# Altium PCB DB42.PcbDoc (part 4 of 8)
Units mil, origin at the board's own origin, x right, y up, seen from the top; angles counter-clockwise.
Board outline 3236.22 x 4456.69 mil, 8 copper layers (Top Layer, MidLayer1, MidLayer2, GND-Layer5, MidLayer3, VCC, MidLayer4, Bottom Layer), stack 62.194 mil thick; 214 components, 470 nets, 1802 pads, 1663 vias.
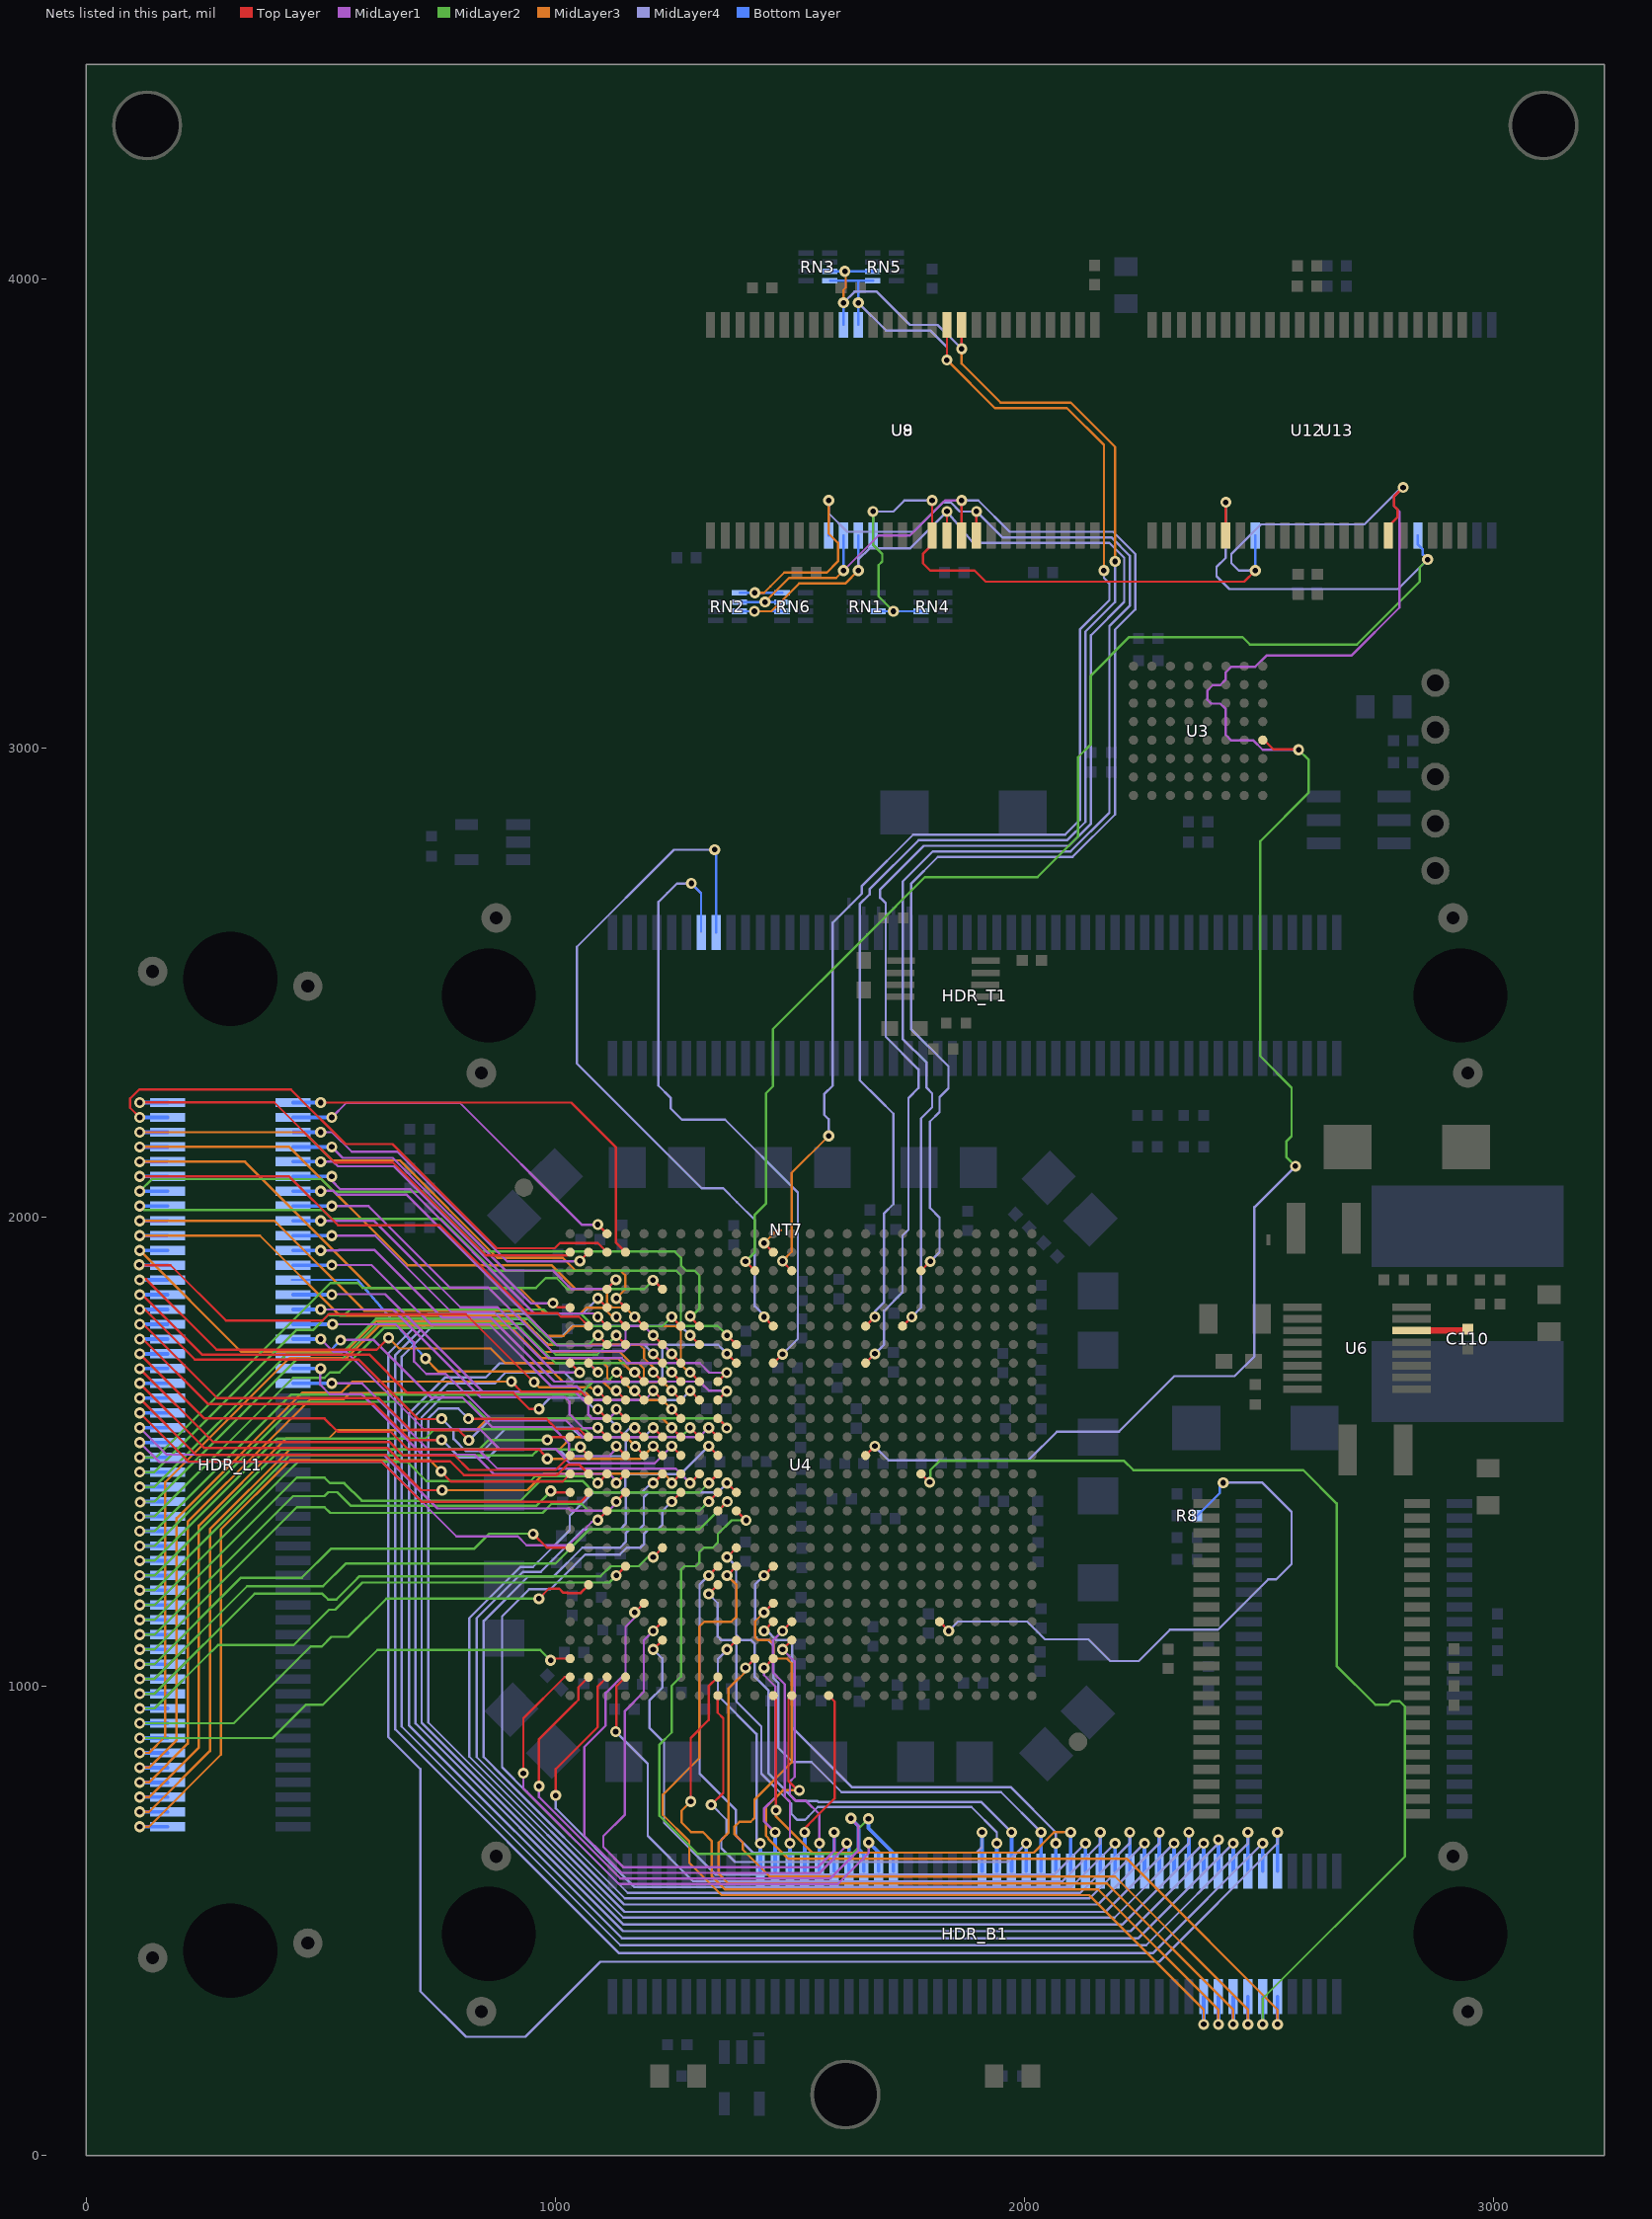
[diagram p10: the nets of this part, all layers, seen from the top]

## Via types
v1: diameter 23.62, hole 11.81, Top Layer to Bottom Layer, 1081 vias
v2: diameter 23.62, hole 11.81, Top Layer to Bottom Layer, tented both sides, 466 vias
v3: diameter 27.56, hole 15.75, Top Layer to Bottom Layer, 116 vias

## Nets (pads, with @x,y where several pads share a name; then routed paths per layer and width w, separated by ;. In a path a pad name is that pad's centre, name@x,y a point inside that pad or via, vN(x,y) a via of type N, cw(c..) or ccw(c..) an arc to the next point about the centre after c; other vN are vias at no path point) (continued)
BUS_NWE: RN1.7 RN4.6 U3.A5 U4.N17 U8.16 U9.16 U12.17 U13.17 | length 5598.1
  Top Layer w5: U4.N17@1661.42,1492.13 v1(1681.1,1511.81) ; U8.16@1803.14,3452.75 v2(1803.14,3527.55) ; U8.16@1803.15,3460.62 1803.15,3433.07 1783.46,3413.39 1783.46,3393.7 1799.21,3377.95 1893.7,3377.95 1917.32,3354.33 2468.5,3354.33 v1(2492.13,3377.95) ; U3.A5@2507.87,3016.73 2510.82,3016.74 2530.31,2997.24 v1@2583.46,2997.24 ; v1@2582.28,2998.03 v1(2584.25,2996.06) ; U12.17@2775.59,3452.76 2775.59,3472.44 2795.28,3492.13 2795.28,3507.87 2787.4,3515.75 2787.4,3535.43 v1(2807.09,3555.12)
  MidLayer1 w5: v1(2584.25,2996.06) 2507.87,2996.06 2488.19,3015.75 2440.94,3015.75 2429.13,3027.56 2429.13,3082.68 2417.32,3094.49 2397.64,3094.49 2389.76,3102.36 2389.76,3122.05 2401.57,3133.86 2417.32,3133.86 2429.13,3145.67 2429.13,3161.42 2440.94,3173.23 2492.13,3173.23 2515.75,3196.85 2696.85,3196.85 2799.21,3299.21 2799.21,3503.94 2787.4,3515.75 2787.4,3535.43 v1(2807.09,3555.12)
  MidLayer2 w5: v2(1677.17,3503.94) 1677.17,3433.07 1696.85,3413.39 1696.85,3397.64 1688.98,3389.76 1688.98,3322.83 v1(1720.47,3291.34) ; v1(2577.56,2108.66) 2557.87,2128.35 2557.87,2161.02 2569.29,2172.44 2569.29,2275.99 2502.31,2342.96 2502.31,2801.13 2605.91,2904.72 2605.91,2974.41 v1(2584.25,2996.06)
  MidLayer4 w5: v2(1677.17,3503.94) 1720.47,3503.94 1744.09,3527.55 v2(1803.14,3527.55) ; v1@1681.1,1510.69 1709.9,1481.89 2008.27,1481.89 2069.29,1542.91 2201.18,1542.91 2319.37,1661.1 2447.92,1661.1 2490.08,1703.26 2490.08,2021.18 v1(2577.56,2108.66) ; v1(2492.13,3377.95) 2456.69,3377.95 2440.94,3393.7 2440.94,3413.39 2503.94,3476.38 2724.41,3476.38 v1@2805.12,3557.09
  Bottom Layer w5: U9.16@1677.17,3452.76 v2(1677.17,3503.94) ; RN1.7@1688.18,3291.34 RN4.6@1779.53,3291.33 RN4.6@1779.92,3291.34 ; v1(2492.13,3377.95) U13.17@2492.13,3452.76
BUS_SDRAM_CKE: RN3.7 RN5.6 U4.F17 U8.37 U9.37 | length 3341.3
  Top Layer w5: U4.F17@1661.42,1767.72 v1(1681.1,1787.4) ; v2(1866.14,3850.39) U8.37@1866.14,3901.57
  MidLayer3 w5: v2(1614.17,3948.82) 1614.17,3976.38 1618.9,3981.11 v1@1618.9,4015.75 ; v2(1866.14,3850.39) 1866.14,3818.9 1948.82,3736.22 2098.43,3736.22 2192.91,3641.73 v1(2192.91,3397.64)
  MidLayer4 w5: v2(1614.17,3948.82) 1637.8,3972.44 1685.04,3972.44 1755.91,3901.57 1814.96,3901.57 v2(1866.14,3850.39) ; v1(1681.1,1787.4) 1681.1,1799.31 1700.79,1819 1700.79,1925.59 1700.89,1925.69 1700.89,2008.37 1720.47,2027.95 1720.47,2220.47 1689.76,2251.18 1648.82,2292.12 1648.82,2666.9 1669.68,2687.76 1669.68,2698.43 1774.41,2803.15 2090.55,2803.15 2129.92,2842.52 2129.92,3248.03 2192.91,3311.02 v1(2192.91,3397.64)
  Bottom Layer w5: RN3.7@1586.22,4015.75 v1(1617.14,4015.75) RN5.6@1676.19,4015.75 RN5.6@1677.56,4015.75 ; U9.37@1614.17,3901.57 v2(1614.17,3948.82)
BUS_SDRAM_CLK: NT7.2 RN3.8 RN5.5 U4.C13 U8.38 U9.38 | length 3185.7
  Top Layer w5: v1@1484.25,1905.51 U4.C13@1503.94,1885.83 ; v2(1834.64,3826.77) U8.38@1834.65,3901.57
  MidLayer1 w5: v1(1484.25,1906.3) v1@1485.43,1906.3
  MidLayer3 w5: v1(1484.25,1906.3) 1503.96,1926 1503.96,2094.47 v1(1582.68,2173.23) ; v2(1834.64,3826.77) 1937,3724.41 2090.55,3724.41 2169.29,3645.67 v1(2169.29,3377.95)
  MidLayer4 w5: v1(1582.68,2173.23) 1582.68,2208.66 1573,2218.34 1573,2262 1591.2,2280.2 1591.2,2627.42 1653.54,2689.76 1653.54,2705.91 1762.6,2814.96 2086.61,2814.96 2118.11,2846.46 2118.11,3251.97 2181.1,3314.96 2181.1,3350.39 2169.29,3362.2 v1(2169.29,3377.95) ; v2(1645.67,3948.82) 1704.72,3889.76 1799.21,3889.76 1834.64,3854.34 v2(1834.64,3826.77)
  Bottom Layer w5: RN3.8@1586.22,3996.06 RN5.5@1676.19,3996.06 RN5.5@1677.56,3996.06 ; U9.38@1645.67,3901.57 v2(1645.67,3948.82) 1645.67,3996.06
BUS_SDRAM_FEEDBACK: NT7.1 U4.B12 | length 75.8
  Top Layer w5: v1(1444.88,1944.88) U4.B12@1464.57,1925.2
  MidLayer2 w5: v1(1444.88,1944.88) v1@1445.67,1944.88
  MidLayer3 w5: v1(1444.88,1944.88) 1472.44,1972.44 NT7.1@1480.65,1972.44
BUS_SDRAM_NCAS: RN2.7 RN6.6 U4.H17 U8.17 U9.17 | length 3341.6
  Top Layer w5: U4.H17@1661.42,1688.98 v1(1681.1,1708.66) ; U8.17@1834.65,3452.76 1834.64,3499.99 v1(1834.65,3503.94)
  MidLayer3 w5: v1(1424.23,3291.34) 1460.63,3291.34 1519.68,3350.39 1618.11,3350.39 v2(1645.67,3377.95)
  MidLayer4 w5: v2(1645.67,3377.95) 1645.67,3401.57 1669.29,3425.2 1755.91,3425.2 v1(1834.65,3503.94) 1890.42,3437.01 2181.1,3437.01 2212.6,3405.51 2212.6,3311.02 2141.73,3240.16 2141.73,2838.58 2094.49,2791.34 1785.43,2791.34 1692.52,2698.43 1692.52,2680.71 1704.26,2668.96 1704.26,2384.54 1774.02,2314.78 1774.02,2275.2 1752.76,2253.94 1752.76,1973.23 1740.18,1960.65 1740.18,1905.78 ; v1@1682.28,1709.84 1700.79,1728.35 1700.79,1800.39 1740.16,1839.76 1740.16,1905.04
  Bottom Layer w5: RN2.7@1393.3,3291.34 RN6.6@1483.28,3291.34 ; v2(1645.67,3377.95) U9.17@1645.67,3452.76
BUS_SDRAM_NCS: RN2.5 RN6.8 U4.F19 U8.19 U9.19 | length 3385.9
  Top Layer w5: U4.F19@1740.16,1767.72 v1(1759.84,1787.4) ; U8.19@1897.64,3452.76 v2(1897.63,3503.93)
  MidLayer3 w5: v1(1425.2,3330.71) 1444.88,3330.71 1458.54,3344.36 1488.19,3374.02 1578.74,3374.02 1602.36,3397.64 1602.36,3437.01 1582.68,3456.69 v2(1582.68,3527.56)
  MidLayer4 w5: v2(1582.68,3527.56) 1582.68,3500 1622.05,3460.63 1763.78,3460.63 1826.77,3523.62 1842.52,3523.62 1862.21,3503.93 v2(1897.63,3503.93) 1952.76,3448.82 2185.04,3448.82 2224.41,3409.45 2224.41,3303.15 2181.1,3259.84 2181.1,2862.2 2098.43,2779.53 1804.72,2779.53 1740.3,2715.1 1740.3,2380.17 1791.34,2329.13 1791.34,2275.59 1803.15,2263.78 1803.15,2234 1779.53,2210.38 1779.53,1807.09 v1(1759.84,1787.4) v1@1759.45,1787.01
  Bottom Layer w5: RN2.5@1393.31,3330.71 v1(1425.2,3330.71) RN6.8@1483.28,3330.71 RN6.8@1484.26,3330.71 ; U9.19@1582.68,3452.76 v2(1582.68,3527.56)
BUS_SDRAM_NRAS: RN2.6 RN6.7 U4.C20 U8.18 U9.18 | length 3143.8
  Top Layer w5: U4.C20@1779.53,1885.83 v1(1799.21,1905.51) ; U8.18@1866.14,3452.76 v1(1866.14,3527.55)
  MidLayer1 w5: v2(1614.17,3377.95) 1688.98,3452.76 1755.91,3452.76 1830.7,3527.55 v1(1866.14,3527.55)
  MidLayer3 w5: v1(1446.86,3311.02) 1498.05,3362.2 1598.43,3362.2 v2(1614.17,3377.95)
  MidLayer4 w5: v1(1799.21,1905.51) 1818.9,1925.2 1818.9,1999.21 1798.43,2019.68 1798.43,2203.54 1818.9,2224.02 1818.9,2255.91 1837.88,2274.89 1837.88,2321.56 1758.27,2401.18 1758.27,2710.63 1815.35,2767.72 2102.36,2767.72 2192.91,2858.27 2192.91,3251.97 2236.22,3295.28 2236.22,3413.39 2188.98,3460.63 1968.5,3460.63 1901.58,3527.55 v1(1866.14,3527.55) v1@1858.27,3531.5
  Bottom Layer w5: RN2.6@1393.3,3311.02 v1(1446.86,3311.02) RN6.7@1483.28,3311.02 RN6.7@1484.64,3311.02 ; v2(1614.17,3377.95) U9.18@1614.17,3452.76
BUS_SRAM_NCS: U4.C11 U12.6 U13.6 | length 3357.1
  Top Layer w5: v1(1405.51,1905.51) U4.C11@1425.2,1885.83 ; U12.6@2429.13,3452.76 2429.13,3503.94 v2(2429.13,3523.62)
  MidLayer2 w5: v1(1405.51,1905.51) 1425.2,1925.2 1425.2,2005.12 1448.82,2028.74 1448.82,2244.09 1448.82,2263.78 1463.83,2278.79 1463.83,2400.84 1665.15,2602.16 ; 1664.95,2601.96 1665.15,2602.16 ; v2(2859.27,3401.57) 2842.52,3384.83 2842.52,3354.33 2708.66,3220.47 2480.32,3220.47 2464.57,3236.22 2223.42,3236.22 2141.73,3154.53 2141.73,3007.87 2114.17,2980.32 2114.17,2811.02 2027.56,2724.41 1787.4,2724.41 1665.15,2602.16
  MidLayer4 w5: v2(2429.13,3523.62) 2429.13,3405.51 2409.45,3385.83 2409.45,3366.14 2437.01,3338.58 2796.28,3338.58 v2(2859.27,3401.57)
  Bottom Layer w5: U13.6@2838.58,3452.76 2838.58,3433.42 2848.92,3423.08 2848.92,3411.92 v2(2859.27,3401.57)
BUZZER: HDR_B1.40 U4.T10 | length 1446.8
  Top Layer w5: U4.T10@1385.83,1374.02 1386.61,1374.02 v1(1406.69,1353.94)
  MidLayer2 w5: v1(1406.69,1353.94) 1375.59,1353.94 1346.46,1324.8 1346.46,1306.3 1335.43,1295.27 1316.14,1295.27 1307.09,1286.22 1307.09,1263.39 1299.77,1256.07 1274.58,1256.07 1268.09,1249.59 1268.09,1021.09 1248,1001 1248,902 1222,876 1222,724 1303.09,642.91 1632.68,642.91 1645.28,655.51 1645.28,695.67 v2(1667.32,717.72)
  Bottom Layer w7.87: v2(1667.32,717.72) 1667.32,697.64 1720.47,644.49 HDR_B1.40@1720.47,606.3
CAN_RXD: HDR_T1.14 U4.H12 | length 1378.5
  Top Layer w5: U4.H12@1464.57,1688.98 1465.35,1688.98 v1(1484.25,1707.87)
  MidLayer4 w5: v1@1288.98,2711.02 1259.06,2711.02 1238.95,2690.92 1219.68,2671.65 1219.68,2280.31 1245.67,2254.32 1245.67,2231.89 1269.69,2207.87 1361.81,2207.87 1516.93,2052.76 1516.93,1740.55 v1(1484.25,1707.87)
  Bottom Layer w5: v1(1289.76,2711.42) 1310.63,2690.55 HDR_T1.14@1310.63,2609.06
CAN_TXD: HDR_T1.16 U4.F12 | length 1562.1
  Top Layer w5: v1(1444.88,1787.4) U4.F12@1464.57,1767.72
  MidLayer4 w5: v1(1339.76,2783.07) 1253.15,2783.07 1046.06,2575.98 1046.06,2327.17 1311.71,2061.52 1357.77,2061.52 1387.13,2032.16 1425.2,1994.09 1425.2,1810.24 1444.88,1790.55 v1(1444.88,1787.4)
  Bottom Layer w5: HDR_T1.16@1342.52,2606.3 v1@1342.52,2780.32
COMP: C110.2 U6.6 | length 121.4
  Top Layer w13.78: U6.6@2824.58,1758.25 2942.3,1758.25 C110.2@2944.88,1760.82
DAU_RESET_SW: HDR_B1.38 U4.AE1 | length 1225.8
  Top Layer w5: v1(931.85,814.75) 931.85,931.72 1019.81,1019.68 U4.AE1@1031.5,1019.68
  MidLayer1 w5: v1(931.85,814.75) 931.85,782.28 1135.39,578.74 1602.36,578.74 1661.24,637.61 1668.11,644.49 v2(1668.11,667.32)
  Bottom Layer w7.87: v2(1668.11,667.32) 1688.98,646.46 HDR_B1.38@1688.98,606.3
DAU_TFT_BLIGHT: HDR_B1.91 U4.AF13 | length 1698.6
  Top Layer w5: U4.AF13@1503.94,980.31 1496.85,973.23 1496.85,798.43 1516.93,778.35 v1(1520.08,778.35)
  MidLayer3 w5: v1(1520.08,778.35) 1485.22,778.35 1449,742.13 1449,681.27 1453.73,676.54 1453.73,675.01 1496.06,632.68 2218.11,632.68 2251.57,599.21 ; 2251.38,599.02 2539.37,311.02 v2(2539.37,279.53)
  Bottom Layer w7.87: v2(2539.37,279.53) HDR_B1.91@2539.37,338.58
DAU_TFT_BLUE0: HDR_B1.62 U4.AB12 | length 1014.6
  Top Layer w5: v1(1444.88,1118.11) U4.AB12@1464.57,1137.8
  MidLayer4 w5: v1(1444.88,1118.11) 1451.58,1118.11 1471.26,1098.43 1496.85,1098.43 1504.54,1090.74 1504.54,912.79 1539.37,877.95 ; 1539.37,877.95 1542.25,875.06 1632.68,784.65 1971.26,784.65 2066.93,688.98 v2(2066.93,665.35)
  Bottom Layer w7.87: HDR_B1.62@2066.93,606.3 v2(2066.93,665.35)
DAU_TFT_BLUE1: HDR_B1.64 U4.AF12 | length 1020.7
  Top Layer w5: U4.AF12@1464.57,980.31 1470.47,974.41 v1(1470.47,735.83)
  MidLayer3 w5: v1(1470.47,735.83) 1470.47,722.44 1506.16,686.75 1547.24,645.67 2019.69,645.67 2055.88,681.86 2062.99,688.98 v2(2098.42,688.98)
  Bottom Layer w7.87: v2(2098.42,688.98) HDR_B1.64@2098.43,606.3
DAU_TFT_BLUE2: HDR_B1.66 U4.AC6 | length 1460.6
  Top Layer w5: v1(1208.66,1078.74) U4.AC6@1228.35,1098.42
  MidLayer4 w5: v1(1208.66,1078.74) 1227.97,1059.43 1227.97,997.26 1200.39,969.68 1200.39,911.61 1231.66,880.34 1231.66,709.29 1342.52,598.43 2062.99,598.43 v2(2129.92,665.35)
  Bottom Layer w7.87: HDR_B1.66@2129.92,606.3 v2(2129.92,665.35)
DAU_TFT_BLUE3: HDR_B1.68 U4.AE4 | length 1520.6
  Top Layer w5: v1(1128.65,903.31) 1130.19,904.86 1130.19,965.58 1130.16,1000.24 ; 1129.92,1000 1130.16,1000.24 ; 1130.16,1000.71 1130.16,1000.24 ; U4.AE4@1149.61,1019.68 1130.16,1000.24
  MidLayer4 w5: v1(1128.65,903.31) 1196.96,835 1196.96,714.47 1196.91,681.04 1293.31,584.65 2080.71,584.65 2161.42,665.35 v2(2161.42,688.98)
  Bottom Layer w7.87: HDR_B1.68@2161.42,606.3 v2(2161.42,688.98)
DAU_TFT_BLUE4: HDR_B1.70 U4.AE3 | length 1683.9
  Top Layer w5: v1(1000.73,767.52) 1000.73,823.61 1090.55,913.43 1090.55,1000 U4.AE3@1110.24,1019.68
  MidLayer4 w5: v1(1000.73,767.52) 1000.73,739.97 1167.86,572.83 2100.39,572.83 v2(2192.91,665.35)
  Bottom Layer w7.87: HDR_B1.70@2192.91,606.3 v2(2192.91,665.35)
DAU_TFT_CL1: HDR_B1.88 U4.H6 | length 3600.2
  Top Layer w5: v1(1208.66,1708.66) U4.H6@1228.35,1688.98
  MidLayer4 w5: 975.45,1736.68 939.84,1772.28 742.36,1772.28 672.44,1702.36 672.44,914.56 1138.57,448.43 2259.45,448.43 2476.38,665.35 v2(2476.38,688.98) ; 975.68,1736.91 984.25,1728.35 1188.98,1728.35 v1(1208.66,1708.66)
  Bottom Layer w7.87: HDR_B1.88@2476.38,606.3 v2(2476.38,688.98)
DAU_TFT_CL2: HDR_B1.90 U4.G8 | length 3780
  Top Layer w5: v1(1287.4,1748.03) U4.G8@1307.09,1728.35
  MidLayer4 w5: v1(1287.4,1748.03) 1267.72,1767.71 1035.41,1767.71 1013.26,1745.56 980.71,1745.56 943.99,1782.28 735.04,1782.28 659.06,1706.3 659.06,908.07 1136.02,431.1 2273.62,431.1 v2(2507.87,665.35)
  Bottom Layer w7.87: v2(2507.87,665.35) HDR_B1.90@2507.88,606.3 v2(2507.87,665.35)
DAU_TFT_CL3: HDR_B1.92 U4.E3 | length 4055.1
  Top Layer w5: v1(1090.55,1826.77) U4.E3@1110.24,1807.09
  MidLayer4 w5: 754.71,1793.7 728.35,1793.7 643.7,1709.06 643.7,892.3 712.2,823.8 712.2,350.39 809.65,252.95 936.02,252.95 1096.06,412.99 2287.01,412.99 2539.37,665.35 v2(2539.37,688.98) ; 754.72,1793.69 1057.47,1793.69 v1(1090.55,1826.77)
  Bottom Layer w7.87: HDR_B1.92@2539.37,606.3 v2(2539.37,688.98)
DAU_TFT_DISP_ON: HDR_B1.89 U4.P20 | length 2363.5
  Top Layer w5: U4.P20@1779.53,1452.76 v1@1799.21,1433.07
  MidLayer2 w5: v1@1799.21,1433.07 1799.21,1460.63 1818.9,1480.32 2212.6,1480.32 2232.28,1460.63 2594.49,1460.63 2665.35,1389.76 2665.35,1043.31 2748.03,960.63 2775.59,960.63 2783.46,968.5 2799.21,968.5 2811.02,956.69 2811.02,637.8 2507.88,334.65 v2(2507.88,279.53)
  Bottom Layer w7.87: v2(2507.88,279.53) HDR_B1.89@2507.88,338.58
  other v1: 1798,1435
DAU_TFT_GREEN0: HDR_B1.72 U4.R7 | length 2441
  Top Layer w5: v1(1248.03,1393.7) U4.R7@1267.72,1413.39
  MidLayer4 w5: v1(1248.03,1393.7) 1227.97,1373.64 1227.97,1344.51 1217.73,1334.27 1198.03,1334.27 1189.35,1325.59 1189.35,1303.52 1181.48,1295.65 1152.31,1295.65 1137.37,1280.71 1063.39,1280.71 989.37,1206.69 943.96,1206.69 886.58,1149.31 886.58,827.54 939.49,774.63 1154.29,559.84 2118.9,559.84 2224.41,665.36 v2(2224.41,688.98)
  Bottom Layer w7.87: HDR_B1.72@2224.41,606.3 v2(2224.41,688.98)
DAU_TFT_GREEN1: HDR_B1.74 U4.R10 | length 2644.9
  Top Layer w5: v1(1366.14,1433.07) U4.R10@1385.83,1413.39
  MidLayer4 w5: v1(1366.14,1433.07) 1346.46,1413.38 1198.82,1413.38 1188.6,1403.16 1188.6,1344.49 1179.13,1335.02 1158.25,1335.02 1152.62,1329.4 1149.98,1326.75 1149.98,1307.46 1137.8,1295.28 1057.48,1295.28 996.06,1233.86 941.7,1233.86 847.31,1139.47 847.31,849.11 890.61,805.8 1147.99,548.43 2138.97,548.43 v2(2255.9,665.35)
  Bottom Layer w7.87: HDR_B1.74@2255.91,606.3 v2(2255.9,665.35)
DAU_TFT_GREEN2: HDR_B1.76 U4.P6 | length 2597.7
  Top Layer w5: v1(1208.66,1433.07) U4.P6@1228.35,1452.76
  MidLayer4 w5: v1(1208.66,1433.07) 1208.27,1432.68 1203.97,1432.68 1184.68,1413.38 1160.63,1413.38 1153.45,1406.2 1149.98,1402.74 1149.98,1346.46 1137.79,1334.27 1059.47,1334.27 969.29,1244.1 931.18,1244.1 832.46,1145.38 832.46,849.24 1146.66,535.04 2157.09,535.04 2287.4,665.35 v2(2287.4,688.98)
  Bottom Layer w7.87: HDR_B1.76@2287.4,606.3 v2(2287.4,688.98)
DAU_TFT_GREEN3: HDR_B1.78 U4.N9 | length 2773
  Top Layer w5: v1(1326.77,1511.81) U4.N9@1346.46,1492.13
  MidLayer4 w5: v1(1326.77,1511.81) 1267.47,1452.51 1158.02,1452.51 1149.23,1443.72 1149.23,1424.84 1137.4,1413.01 1079.9,1413.01 1030.71,1363.82 1030.71,1332.68 962.76,1264.73 952.36,1254.33 925.68,1254.33 816.72,1145.38 816.72,850.18 1147.6,519.29 2172.83,519.29 v2(2318.9,665.35)
  Bottom Layer w7.87: HDR_B1.78@2318.9,606.3 v2(2318.9,665.35)
DAU_TFT_GREEN4: HDR_B1.80 U4.M2 | length 2993.6
  Top Layer w5: v1(814.75,1570.46) 980.67,1570.46 991.85,1559.29 ; 988.41,1562.73 1002.24,1548.9 1050.08,1548.9 1067.48,1531.5 U4.M2@1070.87,1531.5
  MidLayer4 w5: 729,1083.38 729,1570.32 750.79,1592.11 793.1,1592.11 v1(814.75,1570.46) ; 729.14,1083.38 729.14,922.99 1145.05,507.09 2192.13,507.09 2350.39,665.35 v2(2350.39,688.98)
  Bottom Layer w7.87: HDR_B1.80@2350.4,606.3 v2(2350.39,688.98)
DAU_TFT_GREEN5: HDR_B1.82 U4.K8 | length 3265.7
  Top Layer w5: v1(1287.4,1629.92) U4.K8@1307.09,1610.24
  MidLayer4 w5: v1(1287.4,1629.92) 1267.71,1610.23 1078.46,1610.23 1060.22,1628.48 770.06,1628.48 715,1573.42 715,922.42 1145.3,492.13 2208.66,492.13 v2(2381.89,665.35)
  Bottom Layer w7.87: HDR_B1.82@2381.89,606.3 v2(2381.89,665.35)
DAU_TFT_IRQ: HDR_B1.81 U4.W10 | length 2087.6
  Top Layer w5: v1(1366.14,1236.22) U4.W10@1385.83,1255.91
  MidLayer3 w5: v1(1366.14,1236.22) 1386.2,1216.16 1386.2,1148.4 1375.22,1137.42 1316.95,1137.42 1307.09,1127.56 1307.09,847.09 1229,769 1229,726.12 1285.43,669.69 1285.43,624.02 1354.33,555.12 2137.8,555.12 2381.89,311.02 v2(2381.89,279.53)
  Bottom Layer w7.87: v2(2381.89,279.53) HDR_B1.81@2381.89,338.58
DAU_TFT_M: HDR_B1.87 U4.AA12 | length 1981.1
  Top Layer w5: v1(1444.88,1157.48) U4.AA12@1464.57,1177.17
  MidLayer3 w5: v1(1444.88,1157.48) 1428.1,1140.7 1425.57,1138.17 1425.57,1104.35 1431.5,1098.43 1456.3,1098.43 1464.57,1090.16 1464.57,1068.11 1473.62,1059.06 1494.09,1059.06 1503.84,1049.31 1503.84,837.84 1424.41,758.41 1424.41,719.29 1416.54,711.42 1392.52,711.42 1381.5,700.39 1381.5,685.43 1399.61,667.32 1399.61,651.97 1457.09,594.49 2192.91,594.49 2476.38,311.02 v2(2476.38,279.53)
  Bottom Layer w7.87: v2(2476.38,279.53) HDR_B1.87@2476.38,338.58
DAU_TFT_MUX: HDR_B1.85 U4.AD11 | length 1797.5
  Top Layer w5: v1(1405.51,1039.37) U4.AD11@1425.2,1059.05
  MidLayer3 w5: 1393,1019 1368.83,994.83 1368.83,687.73 1348.43,667.32 1348.43,600.39 1368.9,579.92 2175.98,579.92 2444.88,311.02 v2(2444.88,279.53) ; 1393.2,1018.8 1405.51,1031.1 v1(1405.51,1039.37)
  Bottom Layer w7.87: v2(2444.88,279.53) HDR_B1.85@2444.88,338.58
DAU_TFT_POL: HDR_B1.83 U4.AE9 | length 1786.2
  Top Layer w5: v1@1288,754 v1@1288,754.33 ; v1(1288.58,754.33) 1288.58,890.06 1326.77,928.25 1326.77,1000 U4.AE9@1346.46,1019.68
  MidLayer3 w5: v1(1288.58,754.33) 1269.06,734.8 1269.06,709.68 1289.2,689.54 1314.39,689.54 1332.97,670.97 1332.97,596.16 1362.2,566.93 2157.48,566.93 2413.39,311.03 v2(2413.39,279.53)
  Bottom Layer w7.87: v2(2413.39,279.53) HDR_B1.83@2413.39,338.58
DAU_TFT_RED0: HDR_B1.52 U4.W9 | length 1280.8
  Top Layer w5: v1(1326.77,1236.22) U4.W9@1346.46,1255.91
  MidLayer4 w5: v1(1326.77,1236.22) 1307.46,1216.91 1307.46,814.09 1384.55,737 1384.55,682.38 1410.96,655.97 1421.26,645.67 1897.64,645.67 1909.45,657.48 v2(1909.45,688.98)
  Bottom Layer w7.87: HDR_B1.52@1909.45,606.3 v2(1909.45,688.98)
DAU_TFT_RED1: HDR_B1.54 U4.Y9 | length 1159.8
  Top Layer w5: v1(1326.77,1196.85) U4.Y9@1346.46,1216.54
  MidLayer4 w5: v1(1326.77,1196.85) 1346.08,1177.54 1346.08,1106.28 1353.94,1098.43 1376.77,1098.43 1385.83,1089.37 1385.83,967.72 1439,914.54 1439,814.15 1502.76,750.39 1502.76,728.74 1516.14,715.35 1532.28,715.35 1539.76,722.83 ; 1539.7,722.9 1559.71,742.91 1885.04,742.91 ; 1867.63,742.92 1887,742.92 1940.94,688.98 v2(1940.94,665.35)
  Bottom Layer w7.87: HDR_B1.54@1940.95,606.3 v2(1940.94,665.35)
DAU_TFT_RED2: HDR_B1.56 U4.V10 | length 1190
  Top Layer w5: v1(1366.14,1275.59) U4.V10@1385.83,1295.28
  MidLayer4 w5: v1(1366.14,1275.59) 1385.45,1256.28 1385.45,1110.22 1397.24,1098.43 1417.32,1098.43 1425.2,1090.55 1425.2,1020.08 1454.72,990.55 1454.72,814.17 1512.99,755.91 1558.66,755.91 1561.42,753.15 1908.27,753.15 v2(1972.44,688.98)
  Bottom Layer w7.87: HDR_B1.56@1972.44,606.3 v2(1972.44,688.98)
DAU_TFT_RED3: HDR_B1.58 U4.AF9 | length 1100.1
  Top Layer w5: v1@1330.71,745.67 v1(1332.44,747.4) 1357.94,772.9 1357.94,932.06 1346,944 1346,980.31 1346,980.68 U4.AF9@1346.04,980.73
  MidLayer4 w5: v1(1332.44,747.4) 1333.31,747.4 1364.96,715.75 1364.96,683.86 1353.94,672.83 1353.94,654.72 1383.07,625.59 1964.17,625.59 v2(2003.94,665.35)
  Bottom Layer w7.87: HDR_B1.58@2003.94,606.3 v2(2003.94,665.35)
DAU_TFT_RED4: HDR_B1.60 U4.W12 | length 1152.5
  Top Layer w5: v1(1444.88,1236.22) U4.W12@1464.57,1255.91
  MidLayer4 w5: v1(1444.88,1236.22) 1425.57,1216.91 1425.57,1106.3 1433.44,1098.43 1453.15,1098.43 1464.57,1087.01 1464.57,1018.11 1475.2,1007.48 1475.2,869.29 1505.91,838.58 1546.06,838.58 1610.14,774.51 1949.9,774.51 v2(2035.43,688.98)
  Bottom Layer w7.87: HDR_B1.60@2035.43,606.3 v2(2035.43,688.98)
DAU_TFT_STH: HDR_B1.86 U4.H2 | length 3235
  Top Layer w5: U4.H2@1071.39,1688.98 v1(1090.99,1669.38)
  MidLayer4 w5: v1(1090.99,1669.38) 1071.77,1688.59 881.66,1688.59 851.26,1658.19 764.71,1658.19 688,1581.47 688,917 1141.61,463.39 2242.91,463.39 v2(2444.88,665.35)
  Bottom Layer w7.87: HDR_B1.86@2444.88,606.3 v2(2444.88,665.35)
DAU_TFT_STV: HDR_B1.84 U4.H10 | length 3510.4
  Top Layer w5: v1(1366.14,1708.66) U4.H10@1385.83,1688.98
  MidLayer4 w5: 1347.03,1727.97 1236.96,1727.97 1228.03,1719.05 1228.03,1657.06 1220.26,1649.28 1038.58,1649.28 1018.57,1669.29 894.46,1669.29 870.83,1645.67 770.89,1645.67 702,1576.78 702,921 1144.65,478.35 2226.38,478.35 v1@2413.38,665.35 ; 1347.1,1727.9 1355.95,1719.05 ; 1355.85,1718.95 v1(1366.14,1708.66)
  Bottom Layer w7.87: HDR_B1.84@2413.39,606.3 v1(2413.39,673.23)
DIP0: HDR_B1.22 U4.AC10 | length 547.2
  Top Layer w5: v1(1366.14,1078.74) U4.AC10@1385.83,1098.42
  MidLayer4 w5: v1@1366.14,1077.95 1346.46,1058.27 1346.46,980.71 1428.77,898.4 1428.77,673.59 v2(1437.01,665.35) ; v2@1437.1,666.05 1437.4,665.75 v2@1438.58,664.57
  Bottom Layer w7.87: HDR_B1.22@1437.01,606.3 v2(1437.01,665.35)
DIP1: HDR_B1.24 U4.AD12 | length 491
  Top Layer w5: v1(1444.88,1039.37) U4.AD12@1464.57,1059.05
  MidLayer1 w5: v1(1444.88,1039.37) 1444.88,1024 1469,999.88 1469,764 1444.49,739.49 1444.49,712.99 v2(1468.5,688.98)
  Bottom Layer w7.87: HDR_B1.24@1468.5,606.3 v2(1468.5,688.98)
DIP2: HDR_B1.26 U4.AB13 | length 562.8
  Top Layer w5: v1(1484.25,1118.11) U4.AB13@1503.94,1137.8
  MidLayer1 w5: v1(1484.25,1118.11) 1464.19,1098.05 1464.19,1029.13 1489,1004.33 1489,764.94 1500,753.94 v2(1500,665.35)
  Bottom Layer w7.87: HDR_B1.26@1500,606.3 v2(1500,665.35)
DIP3: HDR_B1.28 U4.AF15 | length 405.8
  Top Layer w5: v2(1531.5,688.98) 1531.5,697.16 1549.06,714.72 1595.47,761.14 1595.47,768.55 1595.47,967.52 U4.AF15@1582.68,980.31
  Bottom Layer w7.87: HDR_B1.28@1531.5,606.3 v2(1531.5,688.98)
DIP4: HDR_B1.30 U4.AC13 | length 554
  Top Layer w5: v1(1484.25,1078.74) U4.AC13@1503.94,1098.42
  MidLayer1 w5: v1(1484.25,1078.74) 1510,1052.99 1510,807 1500,797 1500,768.11 1511.81,756.3 1533.7,756.3 1562.99,727.01 v2(1562.99,665.35)
  Bottom Layer w7.87: HDR_B1.30@1562.99,606.3 v2(1562.99,665.35)
DIP5: HDR_B1.32 U4.AB6 | length 1179.2
  Top Layer w5: v1(1208.66,1118.11) U4.AB6@1228.35,1137.8
  MidLayer1 w5: v1(1208.66,1118.11) 1188.6,1098.05 1188.6,988 1148.32,947.72 1148.32,726.88 1102.36,680.93 1102.36,657.59 1145.78,614.17 1559.06,614.17 1594.49,649.61 v2(1594.49,688.98)
  Bottom Layer w7.87: HDR_B1.32@1594.49,606.3 v2(1594.49,688.98)
DIP6: HDR_B1.34 U4.AA5 | length 1231.5
  Top Layer w5: v1(1169.29,1157.48) U4.AA5@1188.98,1177.17
  MidLayer1 w5: 1102.08,641.57 1061.74,681.91 1061.74,870.84 1107.45,916.55 1107.45,985.8 1149.61,1027.95 1149.61,1127.15 1169.29,1146.83 v1(1169.29,1157.48) ; 1102.26,641.74 1141.64,602.36 1562.99,602.36 1623.82,663.19 v2@1625.98,665.35
  Bottom Layer w7.87: v2@1620.87,664.57 1625.98,659.45 HDR_B1.34@1625.99,606.3
  other v2: 1621.26,665.75
DIP7: HDR_B1.36 U4.AE2 | length 1275.3
  Top Layer w5: v1(965.3,787.2) 965.3,887.57 1040.09,962.35 ; 1040.26,962.18 1049.29,971.21 1049.29,998.11 U4.AE2@1070.87,1019.68
  MidLayer1 w5: v1(965.3,787.2) 965.3,763.82 1138.58,590.55 1586.61,590.55 1645.67,649.61 1645.67,702.76 v2(1629.92,718.5)
  Bottom Layer w7.87: v2(1629.92,718.5) 1646.46,701.97 1646.46,653.15 1657.48,642.13 HDR_B1.36@1657.48,606.3
DONE: R8.2 U4.AB21 | length 1263.8
  Top Layer w5: U4.AB21@1818.9,1137.8 v1(1838.58,1118.11)
  MidLayer4 w5: v1(1838.58,1118.11) 1858.61,1138.14 2005.74,1138.14 2043.77,1100.11 2136.26,1100.11 2182.51,1053.86 2243.52,1053.86 2310.02,1120.37 2412.1,1120.37 2519.68,1227.95 2536.61,1227.95 2569.29,1260.63 2569.29,1371.6 2506.25,1434.65 2424.65,1434.65 v1(2423.7,1433.7)
  Bottom Layer w5: R8.2@2367.64,1363.63 2416.43,1412.42 2416.43,1426.43 v1(2423.7,1433.7)
EXTEND_A0: HDR_L1.1 U4.B1 | length 1113.7
  Top Layer w5: v2@114.7,2244.62 400.85,2244.62 529.29,2116.17 654.04,2116.17 851.71,1918.5 1024.8,1918.5 U4.B1@1031.5,1925.2
  Bottom Layer w7.87: v2(114.17,2244.09) HDR_L1.1@173.23,2244.09
EXTEND_A1: HDR_L1.3 U4.B3 | length 1285.2
  Top Layer w5: v2(114.17,2212.6) 93.77,2233 93.77,2252.89 113.08,2272.2 436.45,2272.2 552.79,2155.86 653.19,2155.86 875.3,1933.75 998.79,1933.75 1009.92,1944.88 1090.55,1944.88 U4.B3@1110.24,1925.2
  Bottom Layer w7.87: v2(114.17,2212.6) HDR_L1.3@173.23,2212.6
EXTEND_A2: HDR_L1.5 U4.E4 | length 1305.2
  Top Layer w5: v1(1129.92,1826.77) U4.E4@1149.61,1807.09
  MidLayer3 w5: v2(114.17,2181.1) 464.61,2181.1 524.81,2120.9 668.47,2120.9 876.38,1912.99 1016.14,1912.99 1042.91,1886.22 1138.98,1886.22 1148.82,1876.38 1148.82,1845.67 v1(1129.92,1826.77)
  Bottom Layer w7.87: v2(114.17,2181.1) HDR_L1.5@173.23,2181.1
EXTEND_A3: HDR_L1.7 U4.F5 | length 1305
  Top Layer w5: v1(1169.29,1787.4) U4.F5@1188.98,1767.72
  MidLayer3 w5: v2(114.17,2149.61) 433.06,2149.61 685.03,1897.64 992.13,1897.64 1043.09,1846.68 1103.59,1846.68 1110.29,1839.98 1110.29,1817.92 1120.93,1807.28 1149.3,1807.28 1169.17,1787.4 v1(1169.29,1787.4)
  Bottom Layer w7.87: v2(114.17,2149.61) HDR_L1.7@173.23,2149.6
EXTEND_A4: HDR_L1.9 U4.F4 | length 1249.5
  Top Layer w5: v1(1129.92,1787.4) U4.F4@1149.61,1767.72
  MidLayer3 w5: v2(114.17,2118.11) 338.48,2118.11 608.01,1848.58 ; 608.41,1848.97 924,1848.97 978.3,1794.67 1053.56,1794.67 1065.77,1806.88 1102.41,1806.88 1121.89,1787.4 v1(1129.92,1787.4)
  Bottom Layer w7.87: v2(114.17,2118.11) HDR_L1.9@173.23,2118.11
EXTEND_A5: HDR_L1.11 U4.F2 | length 1150
  Top Layer w5: v2(114.17,2086.62) 433.01,2086.62 537.02,1982.61 754.12,1982.61 941.61,1795.12 1004.76,1795.12 1012.01,1787.87 1050.35,1787.87 1070.69,1767.54 1072.13,1766.1 U4.F2@1072.36,1766.1
  Bottom Layer w7.87: v2(114.17,2086.62) HDR_L1.11@173.23,2086.61
EXTEND_A6: HDR_L1.13 U4.F8 | length 1480.7
  Top Layer w5: v1@1287.4,1787.4 U4.F8@1307.09,1767.72
  MidLayer2 w5: v2(114.17,2055.12) 140.16,2081.11 501.56,2081.11 528.75,2053.92 717.73,2053.92 845.19,1926.46 1255.09,1926.46 1256.86,1924.69 ; 1256.66,1924.49 1267.69,1913.46 1267.69,1897.31 1279.32,1885.68 1297.05,1885.68 1307.27,1875.46 1307.27,1805.29 v1@1289.56,1787.58
  Bottom Layer w7.87: v2(114.17,2055.12) HDR_L1.13@173.23,2055.12
  other v1: 1287.59,1788.76
EXTEND_A7: HDR_L1.15 U4.G10 | length 1511.6
  Top Layer w5: v1(1366.14,1748.03) U4.G10@1385.83,1728.35
  MidLayer2 w5: v2(114.17,2023.62) 122.49,2015.31 504.32,2015.31 522.44,1997.19 522.44,1996.4 756.87,1996.4 867.19,1886.08 1257.62,1886.08 1267.5,1876.2 1267.5,1776.94 1276.56,1767.88 1346.3,1767.88 v1(1366.14,1748.03)
  Bottom Layer w7.87: v2(114.17,2023.62) HDR_L1.15@173.23,2023.62
EXTEND_A8: HDR_L1.17 U4.J8 | length 1452.6
  Top Layer w5: v1(1287.4,1669.29) U4.J8@1307.09,1649.61
  MidLayer3 w5: v2(114.17,1992.13) 401.42,1992.13 592.76,1800.79 930.07,1800.79 983.86,1747 1017.63,1747 1038.12,1767.48 1257.33,1767.48 1262.47,1762.34 1267.5,1757.24 1267.5,1685.93 1284.13,1669.29 v1(1287.4,1669.29)
  Bottom Layer w7.87: v2(114.17,1992.13) HDR_L1.17@173.23,1992.12
EXTEND_A9: HDR_L1.19 U4.J6 | length 1319.5
  Top Layer w5: v1(1208.66,1669.29) U4.J6@1228.35,1649.61
  MidLayer3 w5: v2(114.17,1960.63) 370.27,1960.63 540.48,1790.43 921.12,1790.43 983.46,1728.08 1179.64,1728.08 1189.09,1718.63 1189.09,1699.72 1208.66,1680.15 v1(1208.66,1669.29)
  Bottom Layer w7.87: v2(114.17,1960.63) HDR_L1.19@173.23,1960.63
EXTEND_A10: HDR_L1.21 U4.K7 | length 1411.3
  Top Layer w5: v1(1248.03,1629.92) U4.K7@1267.72,1610.24
  MidLayer3 w5: v2(114.17,1929.13) 330.59,1712.72 552.09,1712.72 618.11,1778.74 906.3,1778.74 972.32,1712.72 1137.48,1712.72 1161.12,1689.08 1176.88,1689.08 1188.7,1677.26 1188.7,1657.95 1197.37,1649.28 1228.67,1649.28 v1(1248.03,1629.92) ; v1@1247.35,1629.24 v1@1247.8,1628.8
  Bottom Layer w7.87: v2(114.17,1929.13) HDR_L1.21@173.23,1929.13
EXTEND_A11: HDR_L1.23 U4.K3 | length 1191.3
  Top Layer w5: v2@112.29,1897.5 113.08,1897.5 180.06,1897.5 297.86,1779.7 503.93,1779.7 517.32,1793.09 809.27,1793.09 954.33,1648.03 v1@957.48,1644.88 ; v1(1090.55,1629.92) U4.K3@1110.24,1610.24
  MidLayer3 w5: v1(954.72,1648.43) 966.08,1637.07 1075.62,1637.07 1082.77,1629.92 v1(1090.55,1629.92)
  Bottom Layer w7.87: v2@114.17,1897.64 HDR_L1.23@173.23,1897.64
  other v2: 113.08,1898.29
EXTEND_A12: HDR_L1.25 U4.K5 | length 1274.9
  Top Layer w5: v2@114.26,1867.56 128.05,1867.56 278.16,1717.45 619.3,1717.45 v1(644.52,1742.66) ; v1(1169.29,1629.92) U4.K5@1188.98,1610.24
  MidLayer3 w5: v1(644.52,1742.66) 667.15,1720.03 861.98,1720.03 892.94,1689.08 1102.41,1689.08 1110.69,1680.8 1110.69,1657.56 1118.57,1649.68 1144.96,1649.68 1164.72,1629.92 v1(1169.29,1629.92)
  Bottom Layer w7.87: v2(114.17,1866.14) HDR_L1.25@173.23,1866.14
EXTEND_A13: HDR_L1.27 U4.L3 | length 1187.7
  Top Layer w5: v2(114.17,1834.65) 119.59,1834.65 247.04,1707.2 603.23,1707.2 684.86,1625.57 910.2,1625.57 944.64,1591.13 v1(965.3,1591.13) v1@964.32,1590.14 ; v1(1090.55,1590.55) U4.L3@1110.24,1570.87
  MidLayer4 w5: v1@965.3,1590.16 966.27,1590.16 v1(965.3,1591.13) 988.92,1614.74 1059.77,1614.74 1083.96,1590.55 v1(1090.55,1590.55)
  Bottom Layer w7.87: v2(114.17,1834.65) HDR_L1.27@173.23,1834.64
EXTEND_A14: HDR_L1.29 U4.M5 | length 1314.6
  Top Layer w5: v2(114.17,1803.15) 125.09,1803.15 231.52,1696.71 580.26,1696.71 707.5,1569.48 756.7,1569.48 v1(757.68,1570.46) ; v1(1169.29,1551.18) U4.M5@1188.98,1531.5
  MidLayer4 w5: v1(757.68,1570.46) 783.26,1544.88 783.26,1527.17 808.85,1501.58 846.24,1501.58 895.44,1550.78 1035.17,1550.78 1054.46,1531.5 1139.76,1531.5 1159.45,1551.18 v1(1169.29,1551.18)
  Bottom Layer w7.87: v2(114.17,1803.15) HDR_L1.29@173.23,1803.15
EXTEND_A15: HDR_L1.31 U4.M4 | length 1234.9
  Top Layer w5: v2(114.17,1771.65) 121.91,1771.65 278.95,1614.61 623,1614.61 690.77,1546.85 793.1,1546.85 v1(815.74,1524.22) ; v1(1129.92,1551.18) U4.M4@1149.61,1531.5
  MidLayer4 w5: v1(815.74,1524.22) 862.39,1570.87 1114.17,1570.87 1129.92,1555.12 v1(1129.92,1551.18)
  Bottom Layer w7.87: v2(114.17,1771.65) HDR_L1.31@173.23,1771.65
EXTEND_A16: HDR_L1.33 U4.M6 | length 1337.1
  Top Layer w5: v2(114.17,1740.16) 121.1,1740.16 259.25,1602 613.38,1602 690.19,1525.2 v1(757.68,1525.2) ; v1(1208.66,1551.18) U4.M6@1228.35,1531.5
  MidLayer4 w5: v1(757.68,1525.2) 758.66,1525.2 796.06,1487.81 857.06,1487.81 874.78,1505.52 1007.62,1505.52 1022.42,1490.72 1141.51,1490.72 1150,1499.21 1150,1520.87 1160.24,1531.1 1188.58,1531.1 v1(1208.66,1551.18)
  Bottom Layer w7.87: v2(114.17,1740.16) HDR_L1.33@173.23,1740.15
EXTEND_A17: HDR_L1.35 U4.N6 | length 1286.2
  Top Layer w5: v2(114.17,1708.66) 251.96,1570.88 507.87,1570.88 536.63,1542.12 649.44,1542.12 687.02,1504.54 966.29,1504.54 v1(983.02,1484.86) ; v1(1208.66,1511.81) U4.N6@1228.35,1492.13
  MidLayer3 w5: v1(983.02,1484.86) 1181.7,1484.86 v1(1208.66,1511.81)
  Bottom Layer w7.87: v2(114.17,1708.66) HDR_L1.35@173.23,1708.66
EXTEND_A18: HDR_L1.37 U4.N1 | length 1078.6
  Top Layer w5: v2(114.17,1677.17) 270.5,1520.84 646.49,1520.84 675.2,1492.13 784.85,1492.13 815.74,1461.24 1000.61,1461.24 U4.N1@1031.5,1492.13
  Bottom Layer w7.87: v2(114.17,1677.17) HDR_L1.37@173.23,1677.16
EXTEND_A19: HDR_L1.39 U4.P2 | length 1115.6
  Top Layer w5: v2(114.17,1645.67) 250.82,1509.02 ; 249.34,1510.5 251.57,1508.27 641.57,1508.27 669.9,1479.94 775.39,1479.94 804.91,1450.42 1001.85,1450.42 1002.67,1451.24 1004.75,1451.24 1025.44,1471.93 1051.69,1471.93 U4.P2@1070.87,1452.76
  Bottom Layer w7.87: v2(114.17,1645.67) HDR_L1.39@173.23,1645.67
EXTEND_A20: HDR_L1.41 U4.P7 | length 1328.4
  Top Layer w5: v2@113.08,1614.61 113.84,1613.85 234.43,1493.26 638.74,1493.26 686.33,1445.67 714.06,1417.94 v1(758.66,1417.94) ; v1(1248.03,1433.07) U4.P7@1267.72,1452.76
  MidLayer3 w5: v1(758.66,1417.94) 940,1417.94 974.97,1452.91 1232.2,1452.91 1248.03,1437.08 v1(1248.03,1433.07)
  Bottom Layer w7.87: v2(114.17,1614.17) HDR_L1.41@173.23,1614.17
EXTEND_A21: HDR_L1.43 U4.R2 | length 1102.5
  Top Layer w5: v2(114.17,1582.68) 160.35,1536.5 217.77,1479.08 629.22,1479.08 714.63,1393.66 1054.76,1393.66 U4.R2@1072.13,1411.02
  Bottom Layer w7.87: v2(114.17,1582.68) HDR_L1.43@173.23,1582.67
EXTEND_A22: HDR_L1.45 U4.R4 | length 1185.9
  Top Layer w5: v1(1129.92,1393.7) U4.R4@1149.61,1413.39
  MidLayer1 w5: v2(114.17,1551.18) 171.64,1493.71 633.7,1493.71 748.41,1379 1028.34,1379 1033.07,1374.27 1113.84,1374.27 1129.92,1390.35 v1(1129.92,1393.7)
  Bottom Layer w7.87: v2(114.17,1551.18) HDR_L1.45@173.23,1551.18
EXTEND_A23: HDR_L1.47 U4.T3 | length 1176.1
  Top Layer w5: v1(1090.55,1354.33) U4.T3@1110.24,1374.02
  MidLayer1 w5: v2(114.17,1519.69) 155.93,1477.93 630.78,1477.93 789.17,1319.54 920.04,1319.54 938.74,1300.85 1028.28,1300.85 1077.48,1350.05 ; 1077.44,1350.09 1081.68,1354.33 v1(1090.55,1354.33)
  Bottom Layer w7.87: v2(114.17,1519.69) HDR_L1.47@173.23,1519.68
EXTEND_A24: HDR_L1.49 U4.D6 | length 1366
  Top Layer w5: v1@1208.66,1866.14 U4.D6@1228.35,1846.46
  MidLayer2 w5: v2(114.17,1488.19) 149.21,1488.19 520.47,1859.45 578.74,1859.45 589.37,1848.82 958.38,1848.82 979.48,1869.92 1002.91,1869.92 1026.16,1846.68 1189.2,1846.68 v1(1208.04,1865.52) v1@1208.66,1866.14
  Bottom Layer w7.87: v2(114.17,1488.19) HDR_L1.49@173.23,1488.19
EXTEND_A25: HDR_L1.51 U4.F7 | length 1388.4
  Top Layer w5: v1(1248.03,1787.4) U4.F7@1267.72,1767.72
  MidLayer2 w5: v2(114.17,1456.69) 145.67,1456.69 448.82,1759.84 484.46,1759.84 515.56,1790.94 516.35,1791.33 ; 515.76,1790.74 516.35,1791.33 ; v1@1248.03,1787.8 v1(1248.03,1787.4) 1228.11,1767.48 1081.33,1767.48 1053.94,1794.88 983.86,1794.88 975.59,1803.15 562.99,1803.15 551.18,1791.33 516.35,1791.33
  Bottom Layer w7.87: v2(114.17,1456.69) HDR_L1.51@173.23,1456.69
EXTEND_A26: HDR_L1.53 U4.G3 | length 1243.7
  Top Layer w5: v1(1091.38,1747.78) U4.G3@1110.24,1728.35
  MidLayer2 w5: v2(114.17,1425.2) 145.67,1425.2 418.72,1698.25 ; 418.03,1698.93 428.28,1709.17 543.31,1709.17 617.6,1783.46 942.13,1783.46 997.51,1728.08 1070.5,1728.08 1090.79,1748.37 v1@1091.38,1748.97
  Bottom Layer w7.87: v2(114.17,1425.2) HDR_L1.53@173.23,1425.19
EXTEND_A27: HDR_L1.55 U4.G4 | length 1303.4
  Top Layer w5: v1(1129.92,1748.03) U4.G4@1149.61,1728.35
  MidLayer2 w5: v1(114.96,1392.52) 116.14,1393.7 145.67,1393.7 448.81,1696.85 545.13,1696.85 621.74,1773.46 934.02,1773.46 1000.67,1706.81 1089.02,1706.81 1113.05,1730.84 ; 1113.09,1730.8 v1@1129.92,1747.64
  Bottom Layer w7.87: v1@114.96,1393.7 HDR_L1.55@173.23,1393.7
EXTEND_A28: HDR_L1.57 U4.J7 | length 1426
  Top Layer w5: v1(1248.03,1669.29) U4.J7@1267.72,1649.61
  MidLayer2 w5: v2(114.17,1362.21) 145.67,1362.21 440.94,1657.48 507.87,1657.48 519.69,1669.29 539.76,1669.29 633.94,1763.46 925.91,1763.46 1000.39,1688.98 1228.35,1688.98 v1(1248.03,1669.29)
  Bottom Layer w7.87: v2(114.17,1362.21) HDR_L1.57@173.23,1362.2
EXTEND_A29: HDR_L1.59 U4.J4 | length 1242.6
  Top Layer w5: v1(1130.78,1669.38) U4.J4@1149.61,1649.61
  MidLayer2 w5: v2(114.17,1330.71) 145.67,1330.71 437,1622.05 1052.72,1622.05 1080.35,1649.68 1111.1,1649.68 v1@1130.31,1668.9
  Bottom Layer w7.87: v2(114.17,1330.71) HDR_L1.59@173.23,1330.71
EXTEND_A30: HDR_L1.61 U4.L9 | length 1491.8
  Top Layer w5: U4.L9@1346.46,1570.87 1347.24,1570.87 v1@1367.32,1550.79
  MidLayer2 w5: v2(114.17,1299.21) 145.67,1299.21 452.96,1606.51 816.75,1606.51 852.38,1570.88 1347.23,1570.88 v1@1367.32,1550.79
  Bottom Layer w7.87: v2(114.17,1299.21) HDR_L1.61@173.23,1299.21
  other v1: 1365.35,1550.39
EXTEND_A31: HDR_L1.63 U4.M8 | length 1388.1
  Top Layer w5: v1(1287.4,1551.18) U4.M8@1307.09,1531.5
  MidLayer2 w5: v2(114.17,1267.72) 145.67,1267.72 403.4,1525.46 ; 403.74,1525.12 403.83,1525.2 406.78,1528.15 723.03,1528.15 742.71,1547.83 1063.11,1547.83 1079.45,1531.49 1267.71,1531.49 v1@1285.43,1549.21
  Bottom Layer w7.87: v2(114.17,1267.72) HDR_L1.63@173.23,1267.71
EXTEND_A32: HDR_L1.65 U4.M1 | length 1100.3
  Top Layer w5: v1@984.98,1523.23 993.25,1531.5 U4.M1@1031.5,1531.5
  MidLayer2 w5: v2(114.17,1236.22) 145.67,1236.22 413.98,1504.54 837.38,1504.54 858.05,1525.2 v1(983.02,1525.2) v1@984.98,1523.23
  Bottom Layer w7.87: v2(114.17,1236.22) HDR_L1.65@173.23,1236.22
EXTEND_A33: HDR_L1.67 U4.N2 | length 1150.5
  Top Layer w5: v1(1053.16,1510.2) 1053.16,1509.02 1070.06,1492.13 U4.N2@1070.87,1492.13
  MidLayer2 w5: v2(114.17,1204.72) 145.67,1204.72 421.26,1480.32 433.07,1492.13 950.93,1492.13 963.34,1504.54 1047.5,1504.54 v1(1053.16,1510.2)
  Bottom Layer w7.87: v2(114.17,1204.72) HDR_L1.67@173.23,1204.72
EXTEND_A34: HDR_L1.69 U4.P3 | length 1217.3
  Top Layer w5: v1(1090.55,1433.07) U4.P3@1110.24,1452.76
  MidLayer2 w5: v2(114.17,1173.23) 145.67,1173.23 440.94,1468.5 441.73,1468.5 451.74,1478.51 684.32,1478.51 725.21,1437.62 946.93,1437.62 957.43,1448.13 1075.49,1448.13 v1(1090.55,1433.07)
  Bottom Layer w7.87: v2(114.17,1173.23) HDR_L1.69@173.23,1173.23
EXTEND_A35: HDR_L1.71 U4.P9 | length 1479.8
  Top Layer w5: v1(1326.77,1433.07) U4.P9@1346.46,1452.76
  MidLayer2 w5: v2(114.17,1141.73) 145.67,1141.73 448.81,1444.88 507.87,1444.88 519.68,1433.07 550,1433.07 587.4,1395.67 925.99,1395.67 968.11,1437.79 1058.27,1437.79 1082.67,1413.39 1307.09,1413.39 v1@1325.79,1432.09
  Bottom Layer w7.87: v2(114.17,1141.73) HDR_L1.71@173.23,1141.73
EXTEND_A36: HDR_L1.73 U4.R1 | length 1131.2
  Top Layer w5: v1(990.2,1416.46) 993.27,1413.39 U4.R1@1031.5,1413.39
  MidLayer2 w5: v2(114.17,1110.24) 145.67,1110.24 440.94,1405.51 507.87,1405.51 516.14,1413.78 535.43,1413.78 564.72,1384.49 958.9,1384.49 990.53,1416.12 v1@992.13,1417.72
  Bottom Layer w7.87: v2(114.17,1110.24) HDR_L1.73@173.23,1110.23
EXTEND_A37: HDR_L1.75 U4.R9 | length 1452.2
  Top Layer w5: v1(1326.77,1393.7) U4.R9@1346.46,1413.39
  MidLayer2 w5: v2(114.17,1078.74) 145.67,1078.74 448.81,1381.89 507.87,1381.89 520.03,1369.73 972.88,1369.73 992.13,1388.98 1056.19,1388.98 1070.89,1374.27 1307.34,1374.27 v1(1326.77,1393.7)
  Bottom Layer w7.87: v2(114.17,1078.74) HDR_L1.75@173.23,1078.74
EXTEND_A38: HDR_L1.77 U4.V1 | length 1104.1
  Top Layer w5: v1(952.69,1324.63) 982.04,1295.28 U4.V1@1031.5,1295.28
  MidLayer2 w5: v2(114.17,1047.24) 145.67,1047.24 329.88,1231.46 460,1231.46 521.52,1292.98 826.56,1292.98 859.03,1325.45 951.87,1325.45 v1(952.69,1324.63)
  Bottom Layer w7.87: v2(114.17,1047.24) HDR_L1.77@173.23,1047.24
EXTEND_A39: HDR_L1.79 U4.T9 | length 1496.2
  Top Layer w5: U4.T9@1346.46,1374.02 1346.85,1374.02 v1(1366.54,1393.7)
  MidLayer2 w5: v2(114.17,1015.75) 145.67,1015.75 343.19,1213.27 504.79,1213.27 553.01,1261.49 999.68,1261.49 1072.83,1334.64 1307.48,1334.64 v1(1366.54,1393.7)
  Bottom Layer w7.87: v2(114.17,1015.75) HDR_L1.79@173.23,1015.74
EXTEND_A40: HDR_L1.81 U4.V6 | length 1312
  Top Layer w5: v1(1208.66,1275.59) U4.V6@1228.35,1295.28
  MidLayer2 w5: v2(114.17,984.25) 145.67,984.25 358.68,1197.26 503.64,1197.26 515.58,1185.32 533.35,1185.32 570.92,1222.89 582.77,1234.73 1096.66,1234.73 1117.82,1255.9 1177.48,1255.9 1197.16,1275.59 v1(1208.66,1275.59)
  Bottom Layer w7.87: v2(114.17,984.25) HDR_L1.81@173.23,984.25
EXTEND_A41: HDR_L1.83 U4.W4 | length 1220
  Top Layer w5: v1(1129.92,1236.22) U4.W4@1149.61,1255.91
  MidLayer2 w5: v2(114.17,952.76) 145.67,952.75 268.23,1075.31 ; 268.31,1075.23 280.92,1087.83 442.07,1087.83 517.72,1163.48 531.1,1163.48 588.76,1221.14 1114.84,1221.14 v1(1129.92,1236.22)
  Bottom Layer w7.87: v2(114.17,952.76) HDR_L1.83@173.23,952.75
EXTEND_A42: HDR_L1.85 U4.Y2 | length 1146.4
  Top Layer w5: v1(964.91,1186.73) 986.18,1208 1008.64,1208 1017.31,1199.34 1025.94,1199.34 1025.58,1198.98 1046.1,1198.98 ; 1046.46,1198.94 1054.18,1198.94 1070.87,1215.63 U4.Y2@1070.87,1216.54
  MidLayer2 w5: v2(114.17,921.26) 314.5,921.26 478.32,1085.08 502.35,1085.08 522.8,1105.52 558.42,1105.52 639.62,1186.73 v1(964.91,1186.73)
  Bottom Layer w7.87: v2(114.17,921.26) HDR_L1.85@173.23,921.26
EXTEND_A43: HDR_L1.87 U4.AD1 | length 1064.6
  Top Layer w5: v1(989.84,1055.59) 993.31,1059.05 U4.AD1@1031.5,1059.05
  MidLayer2 w5: v2(114.17,889.76) 397.26,889.76 468.07,960.57 503.93,960.57 620.83,1077.48 967.95,1077.48 v1(989.84,1055.59)
  Bottom Layer w7.87: v2(114.17,889.76) HDR_L1.87@173.23,889.76
EXTEND_A44: HDR_L1.89 U4.J5 | length 1878
  Top Layer w5: v1(1169.29,1669.29) U4.J5@1188.98,1649.61
  MidLayer3 w5: v2(114.17,858.27) 133.86,858.27 168.4,892.81 168.4,1435.11 433.01,1699.72 555.23,1699.72 624.25,1768.74 901.45,1768.74 970.47,1699.72 1133.14,1699.72 1163.57,1669.29 v1(1169.29,1669.29)
  Bottom Layer w7.87: v2(114.17,858.27) HDR_L1.89@173.23,858.26
EXTEND_A45: HDR_L1.91 U4.K2 | length 1650.7
  Top Layer w5: v1(906.3,1649.61) 927.95,1627.95 1055,1627.95 1070.87,1612.09 U4.K2@1070.87,1610.24
  MidLayer3 w5: v2(114.17,826.77) 133.86,826.77 192.91,885.83 192.91,1358.27 460.63,1625.99 543.7,1625.99 567.39,1649.68 v1@906.3,1649.68
  Bottom Layer w7.87: v2(114.17,826.77) HDR_L1.91@173.23,826.77
EXTEND_A46: HDR_L1.93 U4.L7 | length 1855.8
  Top Layer w5: v1(1248.03,1590.55) U4.L7@1267.72,1570.87
  MidLayer3 w5: v2(114.17,795.28) 133.86,795.28 216.54,877.95 216.54,1350.39 386.09,1519.95 478.35,1612.2 549.61,1612.2 562.81,1625.41 1065.57,1625.41 1080.74,1610.24 1228.35,1610.24 v1(1248.03,1590.55)
  Bottom Layer w7.87: v2(114.17,795.28) HDR_L1.93@173.23,795.27
EXTEND_A47: HDR_L1.95 U4.M7 | length 1840
  Top Layer w5: v1(1248.03,1551.18) U4.M7@1267.72,1531.5
  MidLayer3 w5: v2(114.17,763.78) 133.86,763.78 240.16,870.08 240.16,1342.52 425.79,1528.15 516.8,1528.15 534.51,1545.86 830.5,1545.86 855.5,1570.87 1228.35,1570.87 v1(1248.03,1551.18)
  Bottom Layer w7.87: v2(114.17,763.78) HDR_L1.95@173.23,763.78
EXTEND_A48: HDR_L1.97 U4.N5 | length 1765.1
  Top Layer w5: v1@1167.32,1511.42 v1(1170.47,1511.42) ; v1@1174.02,1511.42 v1(1170.47,1511.42) ; U4.N5@1188.98,1492.13 1188.98,1492.91 v1(1170.47,1511.42)
  MidLayer3 w5: v2(114.17,732.28) 133.86,732.28 263.78,862.2 263.78,1334.65 433.67,1504.54 1008.21,1504.54 1035.17,1531.5 1150.39,1531.5 v1(1170.47,1511.42)
  Bottom Layer w7.87: v2(114.17,732.28) HDR_L1.97@173.23,732.28
EXTEND_A49: HDR_L1.99 U4.P1 | length 1604.6
  Top Layer w5: v1@757.68,1456.32 777.4,1436.6 1015.34,1436.6 U4.P1@1031.5,1452.76
  MidLayer3 w5: v2(114.17,700.79) 133.86,700.79 287.4,854.33 287.4,1334.65 434.19,1481.44 733.54,1481.44 v1(756.7,1458.29)
  Bottom Layer w7.87: v2(114.17,700.79) HDR_L1.99@173.23,700.78
EXTEND_B0: HDR_L1.2 U4.B4 | length 959.6
  Top Layer w5: v2(500,2244.1) 1033.66,2244.09 1129.53,2148.22 1129.53,1945.28 U4.B4@1149.61,1925.2
  Bottom Layer w7.87: HDR_L1.2@440.94,2244.09 v2(500,2244.1)
EXTEND_B1: HDR_L1.4 U4.A3 | length 795.9
  Top Layer w5: v1(1090.55,1984.25) U4.A3@1108.66,1966.14
  MidLayer1 w5: v2(523.62,2212.6) 554.72,2243.7 796.46,2243.7 1056.3,1983.86 1090.16,1983.86 v1(1090.55,1984.25)
  Bottom Layer w7.87: HDR_L1.4@440.94,2212.6 v2(523.62,2212.6)
EXTEND_B2: HDR_L1.6 U4.B2 | length 752.9
  Top Layer w5: v1@1052.36,1906.69 U4.B2@1070.87,1925.2
  MidLayer1 w5: v2(500,2181.1) 524.41,2181.1 566.14,2139.37 663.78,2139.37 877.56,1925.59 897.64,1905.51 1052.36,1905.51 v1@1053.54,1905.51
  Bottom Layer w7.87: HDR_L1.6@440.94,2181.1 v2(500,2181.1)
  other v1: 1052.36,1906.55
EXTEND_B3: HDR_L1.8 U4.D3 | length 848.5
  Top Layer w5: U4.D3@1110.24,1847.64 v1(1129.13,1866.54)
  MidLayer1 w5: v2(523.62,2149.61) 546.85,2126.38 653.54,2126.38 893.7,1886.22 994.78,1886.22 1034.17,1846.83 1109.43,1846.83 v1(1129.13,1866.54)
  Bottom Layer w7.87: HDR_L1.8@440.94,2149.6 v2(523.62,2149.61)
EXTEND_B4: HDR_L1.10 U4.E1 | length 717
  Top Layer w5: v1(994.88,1816.65) 1003.7,1807.83 U4.E1@1029.41,1807.83
  MidLayer1 w5: v2(500,2118.11) 526.77,2118.11 536.62,2108.27 655.91,2108.27 947.52,1816.65 v1(994.88,1816.65)
  Bottom Layer w7.87: HDR_L1.10@440.94,2118.11 v2(500,2118.11)
EXTEND_B5: HDR_L1.12 U4.F3 | length 806.7
  Top Layer w5: v1(1090.55,1787.4) U4.F3@1110.24,1767.72
  MidLayer1 w5: v2(523.62,2086.62) 523.62,2077.56 541.73,2059.45 690.55,2059.45 955.12,1794.88 1083.07,1794.88 v1(1090.55,1787.4)
  Bottom Layer w7.87: HDR_L1.12@440.94,2086.61 v2(523.62,2086.62)
EXTEND_B6: HDR_L1.14 U4.G6 | length 970.3
  Top Layer w5: v1(1208.66,1748.03) U4.G6@1228.35,1728.35
  MidLayer1 w5: v2@500.39,2055.91 527.17,2055.91 534.88,2048.19 682.12,2048.19 1003.94,1726.38 1137.8,1726.38 1149.61,1738.19 1149.61,1761.26 1155.91,1767.56 1189.13,1767.56 v1(1208.66,1748.03)
  Bottom Layer w7.87: HDR_L1.14@440.94,2055.12 v2(500,2055.12)
EXTEND_B7: HDR_L1.16 U4.H7 | length 978.3
  Top Layer w5: v1(1248.03,1708.66) U4.H7@1267.72,1688.98
  MidLayer1 w5: v2(523.62,2023.62) 601.69,2023.62 775.31,1850 857.09,1850 992.91,1714.17 1146.46,1714.17 1160.63,1728.35 1229.53,1728.35 1248.62,1709.25 v1@1249.21,1708.66
  Bottom Layer w7.87: HDR_L1.16@440.94,2023.62 v2(523.62,2023.62)
EXTEND_B8: HDR_L1.18 U4.J9 | length 1084.1
  Top Layer w5: U4.J9@1346.46,1649.61 v1(1365.35,1668.5)
  MidLayer1 w5: v2@500,1991.73 613.9,1991.73 797.76,1807.87 877.21,1807.87 985.48,1699.61 1141.73,1699.61 1152.36,1688.98 1307.87,1688.98 1327.68,1669.17 ; 1328.35,1668.5 v1(1365.35,1668.5)
  Bottom Layer w7.87: HDR_L1.18@440.94,1992.12 v2(500,1992.13)
EXTEND_B9: HDR_L1.20 U4.H1 | length 760.3
  Top Layer w5: U4.H1@1031.99,1688.98 v1(1051.73,1669.23) v1@1052.37,1668.59
  MidLayer1 w5: v2(523.62,1960.63) 615.48,1960.63 778.87,1797.24 869.4,1797.24 997.41,1669.23 v1(1051.73,1669.23)
  Bottom Layer w7.87: HDR_L1.20@440.94,1960.63 v2(523.62,1960.63)
EXTEND_B10: HDR_L1.22 U4.K9 | length 1080.4
  Top Layer w5: U4.K9@1346.46,1610.24 1366.54,1630.32 v1@1367.72,1631.5
  MidLayer1 w5: v2(500,1929.14) 538.25,1929.14 538.74,1929.62 615,1929.62 759.19,1785.43 862.51,1785.43 998.34,1649.61 1307.88,1649.61 1312.99,1644.49 1327.56,1629.92 v1@1366.93,1629.92
  Bottom Layer w7.87: HDR_L1.22@440.94,1929.13 v2(500,1929.14)
  other v1: 1365.35,1629.13
EXTEND_B11: HDR_L1.24 U4.K6 | length 916.9
  Top Layer w5: v1(1208.66,1629.92) U4.K6@1228.35,1610.24
  MidLayer1 w5: v2@526.77,1898.03 608.22,1898.03 735.15,1771.1 859.82,1771.1 991.61,1639.3 1045.74,1639.3 1074.8,1610.24 1190.55,1610.24 v1@1207.09,1626.77
  Bottom Layer w7.87: HDR_L1.24@440.94,1897.64 v2(523.62,1897.64)
EXTEND_B12: HDR_L1.26 U4.K4 | length 824.2
  Top Layer w5: v1(1129.92,1629.92) U4.K4@1149.61,1610.24
  MidLayer3 w5: v1(723.24,1698.38) 750.76,1670.87 994.54,1670.87 1015.73,1649.68 1101.23,1649.68 1120.99,1629.92 v1(1129.92,1629.92)
  Bottom Layer w5: HDR_L1.26@438.92,1866.38 440.94,1866.38 578.39,1866.38 v1(723.24,1698.38)
EXTEND_B13: HDR_L1.28 U4.L4 | length 852.1
  Top Layer w5: v1(1129.92,1590.55) U4.L4@1149.61,1570.87
  MidLayer1 w5: v2@523.78,1834.49 v2(523.62,1834.65) 522.44,1835.83 523.62,1835.83 636.97,1835.83 844.45,1628.35 1041.34,1628.35 1070.47,1599.21 1070.47,1578.74 1078.35,1570.87 1114.17,1570.87 1129.92,1586.61 v1(1129.92,1590.55)
  Bottom Layer w7.87: HDR_L1.28@440.94,1834.64 v2(523.62,1834.65)
EXTEND_B14: HDR_L1.30 U4.M3 | length 799.1
  Top Layer w5: v1(1090.55,1551.18) U4.M3@1110.24,1531.5
  MidLayer1 w5: v2(500,1803.15) 653.9,1803.15 840.34,1616.71 1020.41,1616.71 1030.25,1606.87 1030.25,1579.79 1059.84,1550.2 1090.55,1550.2 v1@1091.54,1550.2
  Bottom Layer w7.87: HDR_L1.30@440.94,1803.15 v2(500,1803.15)
EXTEND_B15: HDR_L1.32 U4.M9 | length 1043.4
  Top Layer w5: v1(1326.77,1551.18) U4.M9@1346.46,1531.5
  MidLayer1 w5: v2@525.2,1771.66 659.81,1771.66 698.64,1732.82 698.64,1692.48 725.21,1665.91 766.54,1665.91 865.92,1566.53 1022.77,1566.53 1057.8,1531.5 1307.09,1531.5 v1(1326.77,1551.18)
  Bottom Layer w7.87: HDR_L1.32@440.94,1771.65 v2@523.62,1771.66
  other v2: 525.2,1771.82
EXTEND_B16: HDR_L1.34 U4.N7 | length 959.6
  Top Layer w5: v1(1248.03,1511.81) U4.N7@1267.72,1492.13
  MidLayer1 w5: v2(500,1740.16) 527.14,1713.02 554.7,1713.02 719.88,1547.83 839.35,1547.83 881.66,1505.52 1001.11,1505.52 1031.1,1475.53 1211.75,1475.53 v1(1248.03,1511.81)
  Bottom Layer w7.87: HDR_L1.34@440.94,1740.15 v2(500,1740.16)
EXTEND_B17: HDR_L1.36 U4.N4 | length 856
  Top Layer w5: v1(1129.92,1511.81) U4.N4@1149.61,1492.13
  MidLayer1 w5: v2@541.2,1738.73 542.18,1738.73 612.05,1738.73 735.05,1615.73 802.01,1615.73 864.98,1552.75 993.84,1552.75 1029.26,1517.33 1029.26,1499.82 1038.37,1490.72 1114.34,1490.72 1129.92,1506.3 v1(1129.92,1511.81)
  Bottom Layer w5: HDR_L1.36@439.7,1708.78 440.94,1708.78 513.38,1708.78 v2(542.18,1737.74)
EXTEND_B18: HDR_L1.38 U4.P4 | length 837.8
  Top Layer w5: v1(1129.92,1433.07) U4.P4@1149.61,1452.76
  MidLayer1 w5: v2@498.82,1675.98 498.82,1642.91 518.9,1622.83 ; 520.08,1622.44 587.79,1622.44 672.05,1538.18 672.05,1537.79 715.97,1493.87 827.38,1493.87 868.53,1452.72 1115.39,1452.72 1130.71,1437.4 v1@1130.71,1435.43
  Bottom Layer w7.87: HDR_L1.38@440.94,1677.16 v2(500,1677.17)
EXTEND_B19: HDR_L1.40 U4.P8 | length 962.4
  Top Layer w5: v1(1287.4,1433.07) U4.P8@1307.09,1452.76
  MidLayer1 w5: v2(523.62,1645.67) 588.19,1645.67 729.32,1504.54 835.92,1504.54 876.74,1463.71 1256.76,1463.71 v1(1287.4,1433.07)
  Bottom Layer w7.87: HDR_L1.40@440.94,1645.67 v2(523.62,1645.67)